# Altium PCB Acoustics Board.PcbDoc (part 2 of 2)
Units mil, origin at the board's own origin, x right, y up, seen from the top; angles counter-clockwise.
Board outline 4000 x 4000 mil, 4 copper layers (Top Layer, Middle 1 Layer, Middle 2 Layer, Bottom Layer), stack 53.912 mil thick; 112 components, 90 nets, 392 pads, 175 vias.
Unrouted connection lines stored in the file: 41.
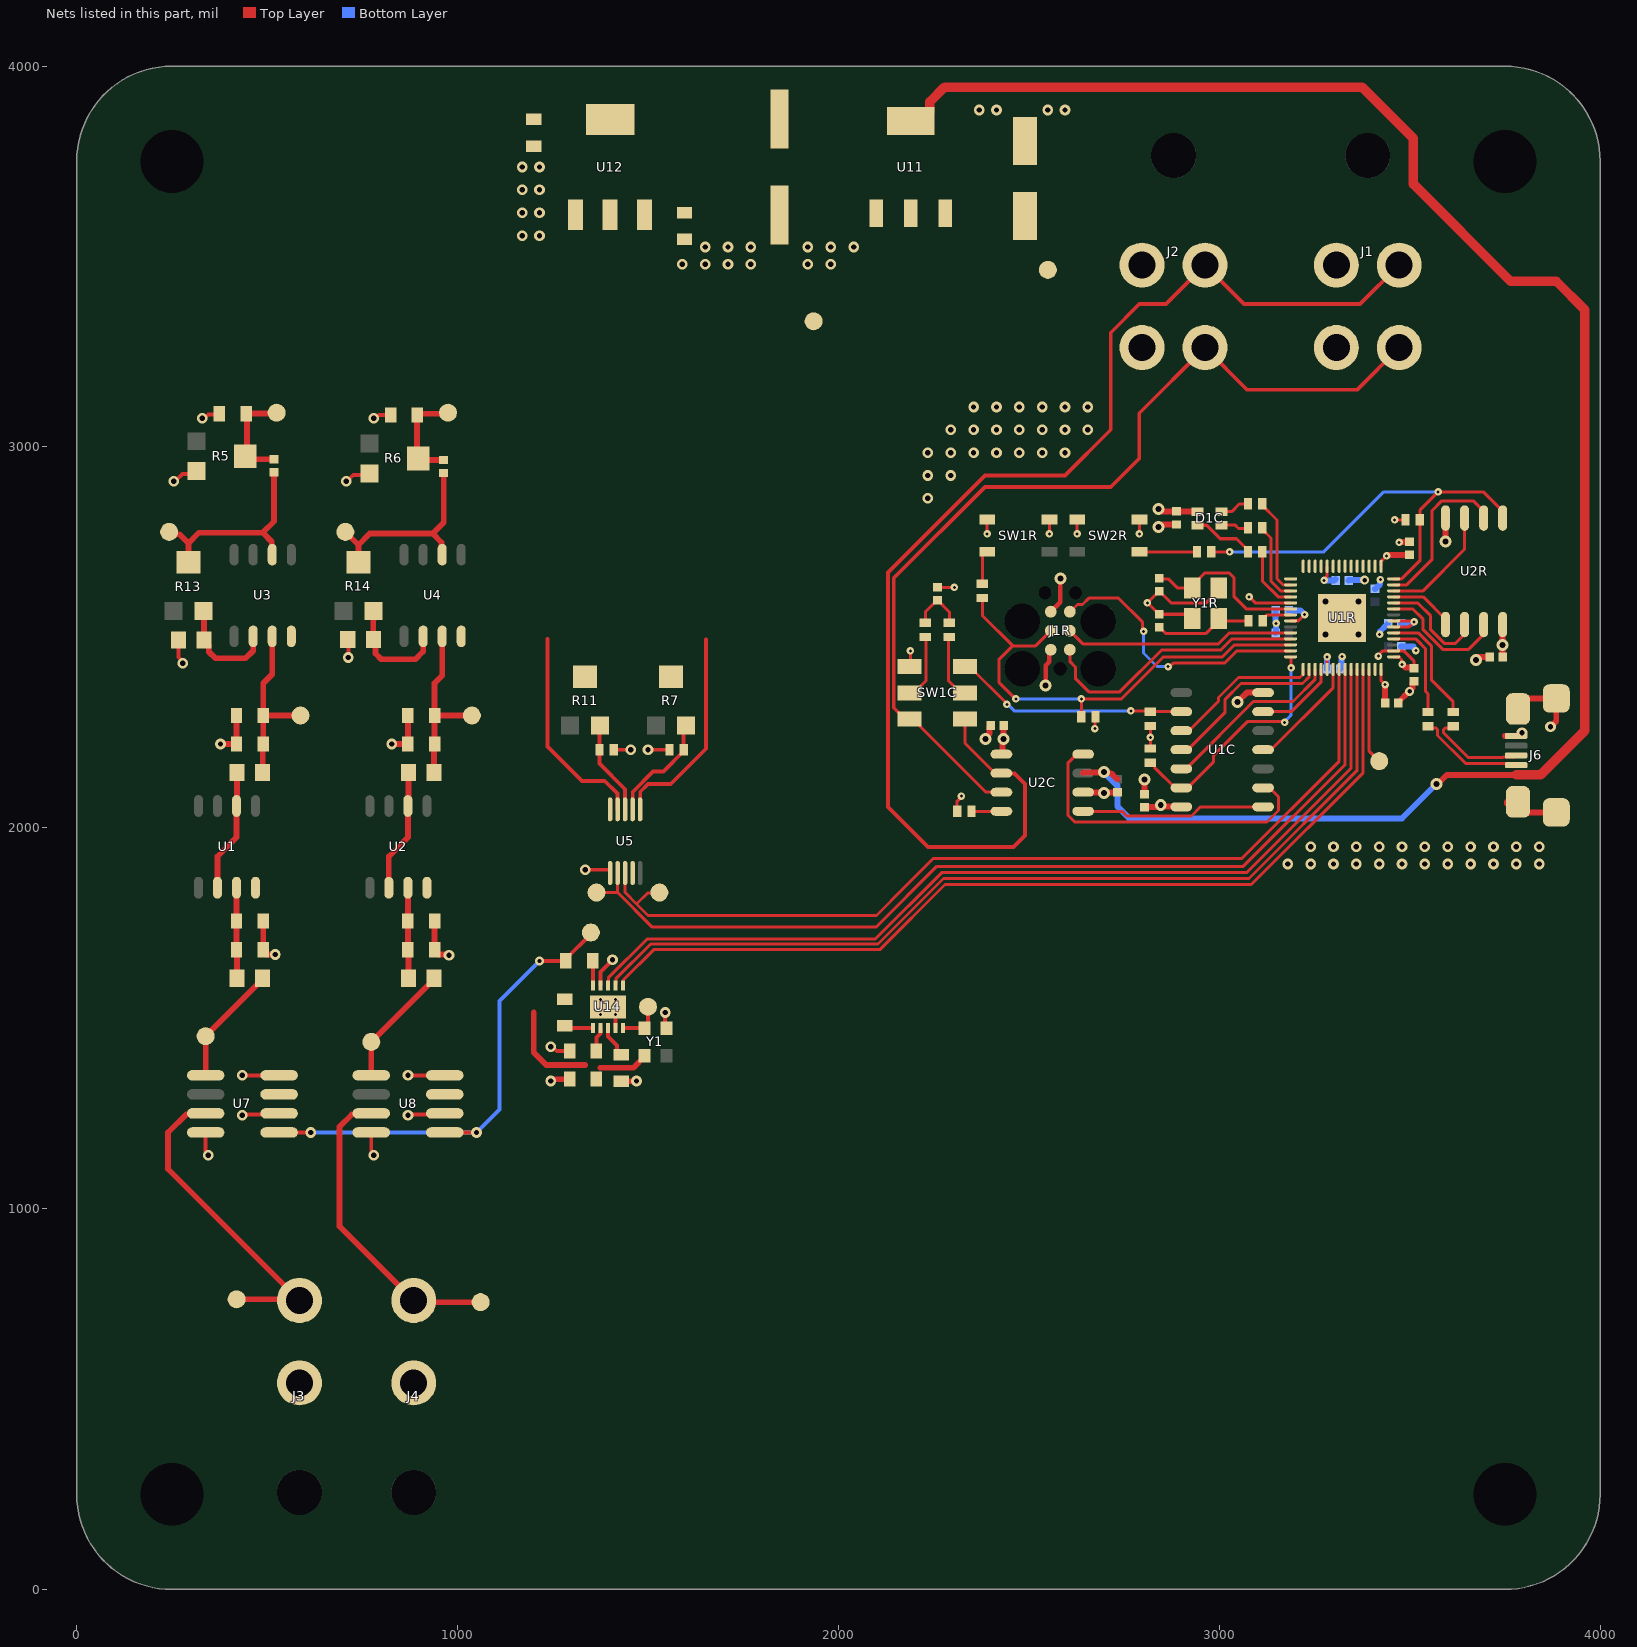
[diagram p4: the nets of this part, all layers, seen from the top]

## Via types
v1: diameter 28, hole 14, Top Layer to Bottom Layer, tented both sides, 99 vias
v2: diameter 19.68, hole 7.87, Top Layer to Bottom Layer, tented both sides, 43 vias
v3: diameter 31.5, hole 15.75, Top Layer to Bottom Layer, tented both sides, 19 vias
v4: diameter 28, hole 14, Top Layer to Bottom Layer, tented top, 11 vias
v5: diameter 23.62, hole 11.81, Top Layer to Bottom Layer, tented both sides, 2 vias
v6: diameter 24, hole 10, Top Layer to Bottom Layer, tented both sides, 1 vias

## Nets (pads, with @x,y where several pads share a name; then routed paths per layer and width w, separated by ;. In a path a pad name is that pad's centre, name@x,y a point inside that pad or via, vN(x,y) a via of type N, cw(c..) or ccw(c..) an arc to the next point about the centre after c; other vN are vias at no path point) (continued)
3V3: C1C.1 C3C.1 C3R.1 C4R.1 C5C.1 C5R.1 C6R.1 C7R.1 C8R.1 C9R.1 C10R.1 C29.2 C31.1 C32.1 C37.1 D1C.4 J1R.2 R1C.1 R4C.1 R4R.1 R5R.1 R7.2 R11.2 TP19.TP U1C.14 U1R.1 U1R.10 U1R.22 U1R.33 U1R.42 U1R.43 U1R.44 U1R.48 U1R.49 U2C.5 U2R.8 U5.9 U12.2 U12.4 U14.2 Y1.4 | length 1798.9
  Top Layer w7.87: v2(2673.23,2260.12) 2674.21,2261.1 2674.21,2290.63 R4R.1@2675.2,2291.61 ; C1C.1@2803.15,2054.02 C1C.1@2803.64,2054.51 ; R4C.1@2818.9,2207.95 v2(2818.9,2237.78) R1C.1@2818.9,2267.6 ; v2(3275.59,2649.88) 3275.59,2653.08 3283.46,2660.95 U1R.10@3283.46,2686.79 ; U1R.33@3283.46,2416.12 v2(3283.46,2449.09) ; v2(3418.05,2451.06) 3418.05,2453.76 3429.13,2464.84 U1R.44@3458.17,2464.84 3484.25,2464.84 3511.81,2437.28 C4R.1@3511.81,2418.98 ; U1R.42@3425.2,2416.12 3425.2,2386.1 v2(3435.63,2375.67) ; U1R.1@3425.2,2686.79 3425.2,2700.08 v2(3439.23,2714.12) ; U1R.43@3458.17,2449.09 3471.46,2449.09 3478.81,2441.74 v2@3478.81,2430.92 ; U1R.48@3458.17,2527.83 3498.76,2527.83 v2(3511.51,2540.59) 3511.81,2540.89 3508.02,2540.89 3505.32,2543.58 U1R.49@3458.17,2543.58 ; v2(3460.63,2808.6) R5R.1@3489.17,2808.6
  Top Layer w8: U1R.22@3187.5,2543.58 3187.56,2543.65 3207.97,2543.65 v2(3224.41,2560.09)
  Top Layer w9.84: D1C.4@2942.94,2831.01 D1C.4@2943.23,2831.3
  Top Layer w10: C31.1@1364.68,1414.29 1364.68,1449.48 1375.31,1460.11 U14.2@1375.31,1474.29
  Top Layer w11.81: v3(2543.31,2374.29) 2545.08,2376.07 2545.08,2427.25 2554.01,2436.17 2554.01,2463.93 J1R.2@2557.68,2467.6
  Top Layer w15: 1200,1515 1200,1410 1232.7,1377.3 1335,1377.3 ; 1374.49,1370.09 1461.95,1370.09 1491.25,1399.39 Y1.4@1491.25,1401.36
  Top Layer w15.75: U2C.5@2428.15,2193.39 2430.61,2195.85 2430.61,2230.1 v3(2433.07,2232.56) 2433.76,2233.25 2433.76,2267.3 C3C.1@2434.45,2267.99 ; C1C.1@2803.64,2054.51 2837.37,2054.51 2842.2,2059.33 v3(2846.46,2059.33) 2849.28,2056.51 2898.1,2056.51 U1C.14@2900.1,2054.51 ; v3(2840.87,2837.21) 2845.13,2837.21 2851.63,2830.71 C5C.1@2888.11,2830.71 ; C5C.1@2890.52,2831.01 D1C.4@2942.94,2831.01 ; C10R.1@3435.63,2328.29 v2(3435.63,2375.67) ; v2(3439.23,2714.12) 3440.3,2714.12 3442.86,2716.67 C7R.1@3500,2716.67 ; v2(3480.31,2429.41) 3488.91,2420.82 3509.97,2420.82 C4R.1@3511.81,2418.98 ; C3R.1@3744.29,2449.09 U2R.8@3744.29,2533.8
  Bottom Layer w15.75: C8R.1@3182.48,2571.25 3213.37,2571.25 3224.41,2560.2 v2(3224.41,2560.09) ; v2(3275.59,2649.88) 3302.56,2649.88 3305.71,2653.03 C6R.1@3305.71,2653.82 ; C9R.1@3283.46,2417.6 v2(3283.46,2449.09) ; C5R.1@3477.76,2536.95 3506.81,2536.95 3510.45,2540.59 v2(3511.51,2540.59)
  other v1: 2235,2865 2235,2925 2295,2925 2235,2985 2295,2985 2355,2985 2415,2985 2475,2985 2535,2985 2595,2985 2295,3045 2355,3045 2415,3045 2475,3045 2535,3045 2595,3045 2655,3045 2355,3105 2415,3105 2475,3105 2535,3105 2595,3105 2655,3105
  other v3: 3744.09,2480.59
12V: C35.1 J1.3 J2.3 TP16.TP U11.3
+5V: C4C.1 J6.1 U1.7 U2.7 U2C.3 U3.7 U4.7 U5.10 U7.6 U8.6
  other v1: 2355,3405 2400,3405 2445,3405 2490,3405 2355,3450 2400,3450 2445,3450 2490,3450 2355,3495 2400,3495 2445,3495 2490,3495
+5V: C34.1 C36.1 TP18.TP U11.2 U12.3 | length 4757.8
  Top Layer w15.75: 2642.72,2143.39 2644,2144.67 2695.57,2144.67 v3(2696.85,2145.94) ; 2716.2,2142.93 2728.35,2130.79 2729.13,2130.79 2732.28,2127.64 ; v3(3570,2115) 3574.26,2115 3598.08,2138.82 3779.69,2138.82
  Top Layer w25: U11.2@2190,3856.06 2216.57,3856.06 2240.49,3879.98 2240.49,3906.56 2278.94,3945 3375,3945 3510,3810 3510,3690 3765,3435 3885,3435 3960,3360 3960,2255.26 3843.56,2138.82 3779.69,2138.82
  Bottom Layer w15.75: v3(2696.85,2145.94) 2732.28,2110.51 2732.28,2056.16 2763.45,2025 3480,2025 v3(3570,2115)
-5V: U1.4 U2.4 U3.4 U4.4 U5.5 U7.3 U8.3
CANCLK_RP2CAN: U1C.6 U1R.32 | length 217.8
  Top Layer w7.87: U1C.6@3115.16,2305 3189.45,2305 3267.72,2383.27 U1R.32@3267.72,2416.12
CANH_RP2CAN: J1.4 J2.4 SW1C.4 U2C.7 | length 2472.8
  Top Layer w7.87: SW1C.4@2187.01,2285.71 2198.82,2285.71 2214.57,2269.96 2214.57,2266.61 2387.8,2093.39 U2C.7@2428.15,2093.39 U2C.7@2444.88,2093.39
  Top Layer w10: SW1C.4@2187.01,2285.71 2175.2,2285.71 2145.51,2315.39 2145.51,2655.51 2385,2895 2715,2895 2790,2970 2790,3088.39 J2.4@2962.68,3261.06 3073.74,3150 3361.61,3150 J1.4@3472.68,3261.06
CANL_RP2CAN: J1.2 J2.2 SW1C.1 U2C.6 | length 3354.6
  Top Layer w7.87: SW1C.1@2320.87,2285.71 SW1C.1@2332.68,2285.71
  Top Layer w8: SW1C.1@2332.68,2285.71 2332.68,2222.13 2411.42,2143.39 U2C.6@2428.15,2143.39
  Top Layer w10: U2C.6@2428.15,2143.39 2428.74,2142.79 2462.21,2142.79 2490,2115 2490,1980 2460,1950 2235,1950 2130,2055 2130,2670 2385,2925 2595,2925 2715,3045 2715,3300 2790,3375 2860.08,3375 J2.2@2962.68,3477.6 3065.28,3375 3370.08,3375 J1.2@3472.68,3477.6
CANRX_RP2CAN: U1C.2 U2C.4 | length 845.6
  Top Layer w7.87: U2C.4@2642.72,2193.39 2625.98,2193.39 2602.36,2169.76 2602.36,2033.6 2620.53,2015.43 3125.73,2015.43 3155.51,2045.22 3155.51,2081.38 3131.89,2105 U1C.2@3115.16,2105
CANTX_RP2CAN: U1C.1 U2C.1 | length 487.4
  Top Layer w7.87: U2C.1@2642.72,2043.39 2745.06,2043.39 2757.26,2031.18 2926.91,2031.18 2950.73,2055 U1C.1@3115.16,2055
"Comparator L": C5.1 D1.2 R5.2 TP2.TP U5.1 | length 820.6
  Top Layer w10: U5.1@1479.37,2048.66 1479.72,2049.01 1479.72,2094.72 1500,2115 1560,2115 1652.45,2207.45 1652.45,2494.38
  Top Layer w15: D1.2@518,2968.04 476.65,2968.04 476.61,2968 447.09,2968 447.09,3065.16 447.55,3065.62 447.55,3085.62 449.74,3087.81 522.81,3087.81 TP2.TP@525,3090
"Comparator R": C6.1 D2.2 R6.2 TP3.TP U5.4 | length 831
  Top Layer w10: 1236.39,2496.02 1236.39,2213.61 1326.7,2123.3 1386.7,2123.3 1419.97,2090.03 1419.97,2049.01 U5.4@1420.32,2048.66
  Top Layer w15: C6.1@893.4,3083.76 893.4,2965.72 922.92,2965.72 922.97,2965.77 D2.2@963.76,2965.77 ; C6.1@893.61,3083.98 896.62,3086.99 971.99,3086.99 TP3.TP@975,3090
DBG_TX_RP2040: J1R.5 U1R.27 | length 732.1
  Top Layer w7.87: J1R.5@2607.68,2567.6 2609.17,2567.6 2627.74,2586.16 2640.77,2586.16 2657.64,2603.04 2735.82,2603.04 2798.03,2540.82 2798.03,2518.8 v2(2801.18,2515.65) ; v2(2866.14,2423.5) 2870.75,2423.5 2880.6,2433.35 3015.01,2433.35 3046.51,2464.84 U1R.27@3187.5,2464.84
  Bottom Layer w7.87: v2(2801.18,2515.65) 2801.18,2458.94 2836.61,2423.5 v2(2866.14,2423.5)
"Envelope Detector L": D1.1 R13.2 TP7.TP U3.6 | length 558.7
  Top Layer w15: TP7.TP@242.77,2777 248.94,2770.83 269.55,2770.83 293.38,2747 ; R13.2@293.38,2697.09 293.38,2747 ; U3.6@513.38,2717.28 512.11,2718.55 512.11,2751.27 488.38,2775 ; D1.1@518,2933.79 518,2804.63 488.38,2775 ; 293.38,2747 321.38,2775 488.38,2775
"Envelope Detector R": D2.1 R14.2 TP8.TP U4.6 | length 537.5
  Top Layer w15: TP8.TP@705.4,2777 739.68,2742.72 ; R14.2@739.68,2697.72 739.68,2742.72 ; U4.6@959.68,2717.28 958.04,2718.93 958.04,2749.37 934.68,2772.72 ; D2.1@963.76,2931.52 963.76,2801.8 934.68,2772.72 ; 739.68,2742.72 769.68,2772.72 934.68,2772.72
FSYNC: U1R.37 U14.8 | length 2458.5
  Top Layer w7.87: U14.8@1395,1585.71 1395.98,1586.69 1395.98,1605.98 1497.44,1707.44 2096.29,1707.44 2271.18,1882.33 3071.72,1882.33 3346.46,2157.06 U1R.37@3346.46,2416.12
GND: C1.2 C1C.2 C1R.2 C2.2 C2C.1 C2R.2 C3.2 C3C.2 C3R.2 C4.2 C4C.2 C4R.2 C5.2 C5C.2 C5R.2 C6.2 C6R.2 C7R.2 C8R.2 C9R.2 C10R.2 C11R.2 C12R.2 C13R.2 C29.1 C30.1 C31.2 C34.2 C35.2 C36.2 C37.2 J1.1 J1R.6 J2.1 J3.1 J4.1 J6.5 J6.6 J6.7 J6.8 J6.9 L1.2 L2.2 L3.2 L4.2 R5.3 R6.3 R6C.2 R8.2 R9.2 R10.2 R12.2 SW1C.6 SW1R.B1 SW1R.B2 SW2R.B1 SW2R.B2 U1C.7 U1R.19 U1R.57 U2C.2 U2R.4 U5.6 U7.2 U7.4 U7.8 U8.2 U8.4 U8.8 U11.1 U12.1 U14.4 U14.9 U14.11 Y1.2 Y1R.2 Y1R.4 | length 3751
  Top Layer w7.87: SW1C.6@2187.01,2423.5 2188.98,2425.47 v2(2188.98,2464.84) ; C2C.1@2259.84,2631.57 v2(2304.44,2631.57) ; R6C.2@2312.01,2043.39 2312.01,2069.96 2322.83,2080.79 v2(2322.83,2082.95) ; v2(2390.75,2771.93) SW1R.B2@2390.75,2809.33 ; v2(2554.13,2771.93) 2554.13,2805.47 SW1R.B1@2554.25,2805.59 ; v2(2626.97,2771.93) SW2R.B2@2626.97,2809.33 ; v2(2790.35,2771.93) SW2R.B1@2790.35,2809.33 ; v2(3078.74,2606.57) 3094.49,2590.83 U1R.19@3187.5,2590.83 ; U1R.57@3275.59,2590.83 v3(3279.53,2594.76)
  Top Layer w8: SW1R.B1@2551.57,2808.27 SW1R.B1@2554.25,2805.59 ; v2(2811.02,2590.83) v2@2811.61,2590.83 ; Y1R.2@2929.13,2550.2 2918.62,2560.71 C2R.2@2842.52,2560.71 2841.73,2560.71 v2@2811.61,2590.83 ; Y1R.4@2999.13,2630.2 2999.13,2624.29 2965.61,2590.76 2873.49,2590.76 2843.31,2620.94 C1R.2@2842.52,2620.94 2841.73,2620.94 v2@2811.61,2590.83
  Top Layer w10: v1(255,2910) 258.75,2910 277.38,2928.63 307.37,2928.63 R5.3@315,2936.26 ; R9.2@267.35,2493.51 267.35,2447.9 278.38,2436.87 v1(278.38,2432) ; v1(330,3075) 334.87,3075 345.49,3085.62 C5.2@374.77,3085.62 ; U7.8@338.54,1200 338.54,1151.33 345,1144.87 v4(345,1140) ; v4(435,1350) U7.4@531.46,1350 ; v4@437.5,1247.5 U7.2@528.96,1247.5 ; v1@705,2910 709.87,2910 726.22,2926.35 R6.3@765.44,2926.35 ; R10.2@712.02,2494.37 713.38,2493.02 v1(713.38,2447) ; U8.8@773.54,1200 773.54,1151.33 780,1144.87 v4(780,1140) ; v1(780,3075) 784.87,3075 793.86,3083.98 C6.2@823.61,3083.98 ; v4(870,1245) 872.5,1247.5 963.96,1247.5 U8.2@966.46,1250 ; v4(870,1350) U8.4@966.46,1350 ; v1(1245,1425) 1249.87,1425 1260.58,1414.29 C31.2@1294.68,1414.29 ; v4(1335,1890) 1399.79,1890 1400.63,1889.16 U5.6@1400.63,1881.34 ; U14.9@1375.31,1585.71 1375.31,1621.82 v1(1406.75,1653.25) ; R12.2@1410,2205 v4(1455,2205) ; U14.4@1414.68,1474.29 v2(1414.68,1510.31) ; v4(1500,2205) R8.2@1556.3,2205 ; v1(1545,1515) 1545,1477.53 Y1.2@1548.34,1474.2 ; J6.7@3780,2310 3782.56,2310 J6.7@3784.61,2312.05
  Top Layer w11.81: J1R.6@2557.68,2567.6 2582.59,2592.51 v3(2582.59,2654.14)
  Top Layer w15: v1(377.68,2220) L3.2@419.68,2220 C3.2@419.68,2295 ; C1.2@489.68,1755 L1.2@489.68,1680 489.68,1675 497.18,1667.5 v1(521.67,1667.5) ; v1(827.68,2220) L4.2@869.68,2220 C4.2@869.68,2295 ; L2.2@939.68,1755 C2.2@939.68,1680 939.68,1675 947.18,1667.5 971.67,1667.5 974.17,1665 v1(977.68,1665) ; v1(1245,1335) 1248.52,1335 1253.61,1340.09 C29.1@1294.49,1340.09 ; C30.1@1429.68,1334.29 1430.04,1334.65 1469.65,1334.65 v1(1470,1335) ; 3749.69,2241.18 3750.06,2241.56 3783.04,2241.56 3791.48,2250 v1(3795,2250) ; J6.6@3754.61,2067.95 3754.61,2063.76 3777.97,2040.39 J6.9@3855,2040.39 ; J6.7@3807.97,2339.61 J6.8@3885,2339.61 3885,2280 v1(3870,2265)
  Top Layer w15.75: v3(2385.83,2232.56) 2385.83,2236.82 2397.05,2248.04 2397.05,2264.06 2400.2,2267.2 C3C.2@2400.2,2267.99 ; U2C.2@2642.72,2093.39 2644,2092.11 2695.57,2092.11 v3(2696.85,2090.83) 2698.13,2092.11 2731,2092.11 C4C.2@2732.28,2093.39 ; C1C.2@2803.15,2088.27 v3(2803.15,2126.26) ; v3(2840.87,2789.96) 2845.13,2789.96 2851.63,2796.46 C5C.2@2888.11,2796.46 ; v3(3047.77,2330.46) 3072.32,2355 U1C.7@3115.16,2355 ; C10R.2@3469.28,2328.89 3498.93,2358.54 v5(3500,2358.54) 3500,2359.61 3507.87,2367.48 3507.87,2381.57 3511.02,2384.72 C4R.2@3511.81,2384.72 ; v2(3472.44,2749.55) 3473.13,2750.24 3499.31,2750.24 C7R.2@3500,2750.93 ; U2R.4@3594.29,2813.32 3594.39,2813.23 3594.39,2752.34 v3(3594.49,2752.24) ; v3(3674.41,2441.22) 3682.28,2449.09 C3R.2@3707.28,2449.09
  Bottom Layer w15.75: C12R.2@3148.23,2512.09 3148.92,2512.78 3148.92,2536.26 v2(3149.61,2536.95) 3149.61,2538.02 3148.23,2539.39 C8R.2@3148.23,2571.25 ; C9R.2@3317.72,2417.6 3320.87,2420.75 3320.87,2446.55 3322.83,2448.52 v2(3322.83,2449.58) ; C6R.2@3339.96,2649.88 3340.14,2650.06 3381.9,2650.06 v5(3382.08,2650.25) ; C13R.2@3409.45,2627.64 3410.24,2627.64 3422.56,2639.96 3422.56,2651.18 v2(3423.31,2651.93) ; v2(3421.26,2508.15) 3422.01,2508.9 3422.01,2515.46 3439.57,2533.01 3440.35,2533.01 3443.5,2536.16 C5R.2@3443.5,2536.95 ; C11R.2@3477.76,2476.65 3510.75,2476.65 3510.75,2471.78 3516.18,2466.34 v2(3516.18,2465.28)
  other v1: 3180,1905 3240,1905 3300,1905 3360,1905 3420,1905 3480,1905 3540,1905 3600,1905 3660,1905 3720,1905 3780,1905 3840,1905 3240,1950 3300,1950 3360,1950 3420,1950 3480,1950 3540,1950 3600,1950 3660,1950 3720,1950 3780,1950 3840,1950 707.44,2910 1590,3480 1650,3480 1710,3480 1770,3480 1920,3480 1980,3480 1650,3525 1710,3525 1770,3525 1920,3525 1980,3525 2040,3525 1170,3555 1215,3555 1170,3615 1215,3615 1170,3675 1215,3675 1170,3735 1215,3735 2370,3885 2415,3885 2550,3885 2595,3885
  other v2: 1375.31,1510.31 1375.31,1549.68 1414.68,1549.68
  other v3: 3279.53,2508.15 3366.14,2508.15 3366.14,2594.76
  other v4: 435,1245
"Hydrophone L": J3.2 TP15.TP U7.7 | length 869.5
  Top Layer w15: U7.7@338.54,1250 336.14,1247.6 287.6,1247.6 240,1200 240,1103.94 J3.2@585,758.94 581.97,761.97 TP15.TP@420,761.97
"Hydrophone R": J4.2 TP17.TP U8.7 | length 818.6
  Top Layer w15: U8.7@773.54,1250 771.14,1247.6 722.6,1247.6 690,1215 690,953.94 J4.2@885,758.94 889.47,754.47 TP17.TP@1060.53,754.47 TP17.TP@1065,750
INT_RP2CAN: U1C.4 U1R.34 | length 297.2
  Top Layer w7.87: U1C.4@3115.16,2205 3136.15,2205 3299.21,2368.06 U1R.34@3299.21,2413.66
LEDB_RP2CAN: R8C.1 U1R.18 | length 168.1
  Top Layer w7.87: R8C.1@3113.19,2724.68 3113.19,2648.03 3154.64,2606.57 U1R.18@3187.5,2606.57
LEDG_RP2CAN: R7C.1 U1R.17 | length 211.6
  Top Layer w7.87: R7C.1@3113.19,2787.68 3113.19,2783.74 3135.83,2761.1 3135.83,2647.66 3161.17,2622.32 U1R.17@3187.5,2622.32
LEDR_RP2CAN: R5C.1 U1R.16 | length 255
  Top Layer w7.87: R5C.1@3113.19,2850.67 3113.19,2846.73 3151.57,2808.35 3151.57,2654.19 3167.69,2638.07 U1R.16@3187.5,2638.07
"Local Oscillator": C33.2 TP13.TP U7.1 U8.1 | length 1291.5
  Top Layer w10: U7.1@531.46,1200 v4(615,1200) ; U8.1@966.46,1200 v4(1050,1200) ; v6(1215,1650) 1283.47,1650 C33.2@1284.67,1651.2 1284.67,1656.2 1350,1721.53 TP13.TP@1350,1725
  Bottom Layer w10: v4(615,1200) v4(1050,1200) 1110,1260 1110,1545 v6(1215,1650)
MCLK: TP14.TP U14.5 Y1.3 | length 116.3
  Top Layer w10: U14.5@1434.37,1474.29 1475.41,1474.29 1475.5,1474.2 Y1.3@1491.25,1474.2 1500,1482.94 TP14.TP@1500,1530
MISO_RP2CAN: U1C.12 U1R.31 | length 475
  Top Layer w7.87: U1C.12@2900.59,2155 2913.06,2155 3089.44,2331.38 3193.56,2331.38 3251.97,2389.79 U1R.31@3251.97,2416.12
MOSI_RP2CAN: U1C.11 U1R.30 | length 454.6
  Top Layer w7.87: U1C.11@2900.59,2205 2917.32,2205 3015.75,2303.43 3015.75,2337.4 3056.97,2378.62 3218.53,2378.62 3236.22,2396.31 U1R.30@3236.22,2416.12
nCS_RP2CAN: R4C.2 U1C.13 U1R.28 | length 646.2
  Top Layer w7.87: R4C.2@2818.9,2170.55 2822.83,2170.55 2829.72,2163.66 2829.72,2159.13 2883.86,2105 U1C.13@2900.59,2105 2917.32,2105 2984.51,2172.19 2984.51,2189.51 3073.62,2278.62 3170.47,2278.62 v2(3172.03,2277.07) ; U1R.28@3187.5,2449.09 3188.98,2449.09 v2(3188.98,2419.96)
  Bottom Layer w7.87: v2(3172.03,2277.07) 3172.03,2279.36 3188.98,2296.31 v2(3188.98,2419.96)
NetC1_1: C1.1 L1.1 R1.1 U1.3 | length 238.3
  Top Layer w15: U1.3@419.68,1842.72 C1.1@419.68,1755 L1.1@419.68,1680 421.18,1678.5 R1.1@421.18,1605
NetC2_1: C2.1 L2.1 R2.1 U2.3 | length 238.3
  Top Layer w15: U2.3@869.68,1842.72 L2.1@869.68,1755 C2.1@869.68,1680 871.18,1678.5 R2.1@871.18,1605
NetC2C_2: C2C.2 R2C.2 R3C.2 | length 144.3
  Top Layer w7.87: R3C.2@2228.35,2538.66 2228.35,2566.61 2259.06,2597.32 C2C.2@2259.84,2597.32 2260.63,2597.32 2291.34,2566.61 R2C.2@2291.34,2538.66
NetC2R_1: C2R.1 R1R.2 Y1R.3 | length 263.4
  Top Layer w8: C2R.1@2842.52,2526.46 2843.31,2526.46 2859,2510.76 2965.61,2510.76 2999.13,2544.29 Y1R.3@2999.13,2550.2 3005.75,2543.58 R1R.2@3076.85,2543.58
NetC30_2: C30.2 U14.3 | length 85
  Top Layer w10: U14.3@1395,1474.29 1395,1452.02 1418.59,1428.43 1418.59,1414.29 1428.59,1404.29 C30.2@1429.68,1404.29
NetC32_2: C32.2 U14.1 | length 76.6
  Top Layer w10: C32.2@1281.42,1480.12 1287.26,1474.29 U14.1@1355.63,1474.29
NetC33_1: C33.1 U14.10 | length 65.9
  Top Layer w10: C33.1@1354.67,1651.2 1355.63,1650.24 U14.10@1355.63,1585.71
NetD1C_1: D1C.1 R5C.2 | length 78.2
  Top Layer w7.87: D1C.1@3006.22,2829.93 3032.78,2829.93 3053.52,2850.67 R5C.2@3075.79,2850.67
NetD1C_2: D1C.2 R7C.2 | length 73.7
  Top Layer w7.87: D1C.2@3006.22,2794.49 3042.32,2794.49 3050.75,2786.07 3074.18,2786.07 R7C.2@3075.79,2787.68
NetD1C_3: D1C.3 R8C.2 | length 163.8
  Top Layer w8: D1C.3@2943.23,2794.49 2966.92,2794.49 3002.41,2759 3045.41,2759 3075.79,2728.62 R8C.2@3075.79,2724.68
NetR2C_1: R2C.1 SW1C.2 | length 172.3
  Top Layer w7.87: R2C.1@2291.34,2501.26 2289.37,2499.29 2289.37,2386.1 2320.87,2354.61 SW1C.2@2332.68,2354.61
NetR3_2: R3.2 U1.2 U1.6 | length 323.6
  Top Layer w15: U1.2@369.68,1842.72 369.68,1925 419.68,1975 U1.6@419.68,2057.28 421.18,2058.78 R3.2@421.18,2145
NetR3C_1: R3C.1 SW1C.5 | length 172.3
  Top Layer w7.87: SW1C.5@2187.01,2354.61 2198.82,2354.61 2230.32,2386.1 2230.32,2499.29 R3C.1@2228.35,2501.26
NetR4_2: R4.2 U2.2 U2.6 | length 323.6
  Top Layer w15: U2.2@819.68,1842.72 819.68,1925 869.68,1975 U2.6@869.68,2057.28 871.18,2058.78 R4.2@871.18,2145
NetR6C_1: R6C.1 U2C.8 | length 78.7
  Top Layer w7.87: R6C.1@2349.41,2043.39 U2C.8@2428.15,2043.39
NetR6R_1: R6R.1 SW1R.A2 | length 91.3
  Top Layer w7.87: R6R.1@2377.95,2641.02 2377.95,2715.83 2386.81,2724.68 SW1R.A2@2390.75,2724.68
NetR7_3: R7.3 R8.1 U5.2 | length 294
  Top Layer w10: U5.2@1459.69,2048.66 1460.03,2049.01 1460.03,2094.18 1513.63,2147.78 1540.42,2147.78 1593.7,2201.06 R8.1@1593.7,2205 1593.7,2263.46 R7.3@1599.37,2269.13
NetR7R_1: R7R.1 SW2R.A1 | length 151.6
  Top Layer w7.87: SW2R.A1@2790.35,2724.68 R7R.1@2941.93,2724.68
NetR9_1: R9.1 R13.3 U3.2 | length 282.2
  Top Layer w15: R13.3@332.75,2569.13 334.35,2567.53 R9.1@334.35,2493.51 346.85,2481.01 346.85,2462.51 364.36,2445 443.38,2445 463.38,2465 U3.2@463.38,2502.72
NetR10_1: R10.1 R14.3 U4.2 | length 293.9
  Top Layer w15: 779.02,2546.11 R10.1@779.02,2494.37 784.68,2488.71 784.68,2457.72 799.68,2442.72 889.68,2442.72 909.68,2462.72 U4.2@909.68,2502.72 ; R14.3@779.06,2546.14 R14.3@779.06,2569.76
NetR11_3: R11.3 R12.1 U5.3 | length 249.1
  Top Layer w10: R11.3@1374.37,2269.13 1372.6,2267.36 R12.1@1372.6,2205 1372.6,2168.69 1440,2101.29 U5.3@1440,2048.66
NetTP_ADC_TP: TP_ADC.TP U1R.40 | length 252
  Top Layer w7.87: U1R.40@3393.7,2416.12 3393.7,2201.3 TP_ADC.TP@3420,2175
NetU1R_2: U1R.2
NetU1R_3: U1R.3
NetU1R_4: U1R.4
NetU1R_5: U1R.5
NetU1R_6: U1R.6
NetU1R_7: U1R.7
NetU1R_8: U1R.8
NetU1R_9: U1R.9
NetU1R_11: U1R.11
NetU1R_12: U1R.12
NetU1R_13: U1R.13
NetU1R_14: U1R.14
NetU1R_15: U1R.15
NetU1R_41: U1R.41
"Point Filter L": R1.2 TP5.TP U7.5 | length 317
  Top Layer w15: U7.5@338.54,1350 TP5.TP@338.54,1452.86 488.18,1602.5 R1.2@488.18,1605
"Point Filter R": R2.2 TP6.TP U8.5 | length 323.2
  Top Layer w15: U8.5@773.54,1350 TP6.TP@773.54,1437.86 938.18,1602.5 R2.2@938.18,1605
"Post Filter Amp L": C3.1 L3.1 R3.1 TP1.TP U3.3 | length 466.2
  Top Layer w15: R3.1@488.18,2145 488.18,2218.5 L3.1@489.68,2220 C3.1@489.68,2295 ; U3.3@513.38,2502.72 513.38,2403.38 489.68,2379.68 C3.1@489.68,2295 ; TP1.TP@587.68,2295 C3.1@489.68,2295
"Post Filter Amp R": C4.1 L4.1 R4.1 TP4.TP U4.3 | length 464.6
  Top Layer w15: R4.1@938.18,2145 938.18,2218.5 L4.1@939.68,2220 C4.1@939.68,2295 ; U4.3@959.68,2502.72 959.68,2399.68 939.68,2379.68 C4.1@939.68,2295 ; TP4.TP@1037.68,2295 C4.1@939.68,2295
QSPI_SCLK_RP2040: U1R.52 U2R.6 | length 283
  Top Layer w7.87: U1R.52@3458.17,2590.83 3520.87,2590.83 3555.12,2556.57 3555.12,2520.04 3590.63,2484.53 3620.67,2484.53 3644.29,2508.15 U2R.6@3644.29,2529.8
QSPI_SD0_RP2040: U1R.53 U2R.5 | length 178.4
  Top Layer w7.87: U1R.53@3458.17,2606.57 3535.43,2606.57 3594.29,2547.72 U2R.5@3594.29,2533.8 U2R.5@3594.29,2529.8
QSPI_SD1_RP2040: U1R.55 U2R.2 | length 435.6
  Top Layer w7.87: U1R.55@3458.17,2638.07 3492.13,2638.07 3559.06,2705 3559.06,2833.15 3584.51,2858.6 3654.08,2858.6 3654.13,2858.54 3666.73,2858.54 3694.29,2830.98 U2R.2@3694.29,2813.32 U2R.2@3694.29,2809.33
QSPI_SD2_RP2040: U1R.54 U2R.3 | length 309.4
  Top Layer w7.87: U1R.54@3458.17,2622.32 3535.43,2622.32 3644.29,2731.18 U2R.3@3644.29,2809.33
QSPI_SD3_RP2040: U1R.51 U2R.7 | length 334.1
  Top Layer w7.87: U1R.51@3458.17,2575.08 3507.65,2575.08 3535.43,2547.29 3535.43,2519.96 3586.61,2468.78 3654.92,2468.78 3694.29,2508.15 U2R.7@3694.29,2529.8
QSPI_SS_RP2040: R5R.2 R7R.2 U1R.56 U2R.1 | length 1162
  Top Layer w7.87: R7R.2@2979.33,2724.68 v2(3027.56,2724.69) ; U1R.56@3458.17,2653.82 3479.07,2653.82 3527.56,2702.3 3527.56,2834.92 v2(3574.8,2882.17) 3693.11,2882.17 3744.29,2830.98 U2R.1@3744.29,2813.32 U2R.1@3744.29,2809.33
  Bottom Layer w7.87: v2(3027.56,2724.69) 3274.55,2724.69 3432.03,2882.17 v2(3574.8,2882.17)
"RP2040 L": TP9.TP U1R.35 U5.8 | length 2432.5
  Top Layer w8: U5.8@1440,1881.34 1440,1830 1470,1800 ; TP9.TP@1530,1830 1529.06,1829.06 1499.06,1829.06 1470,1800 ; U1R.35@3314.96,2416.12 3314.96,2174.96 3060,1920 2250,1920 2175,1845 2100,1770 1500,1770 1470,1800
"RP2040 R": TP10.TP U1R.36 U5.7 | length 2495.8
  Top Layer w8: TP10.TP@1350,1830 1420.32,1830 ; U5.7@1420.32,1881.34 1420.32,1830 ; U1R.36@3330.71,2416.12 3330.71,2166.22 3063.16,1898.67 2258.67,1898.67 2100,1740 1510.32,1740 1420.32,1830
RUN_RP2040: J1R.4 R4R.2 R6R.2 U1R.26 | length 1275.3
  Top Layer w7.87: R6R.2@2377.95,2603.62 2377.95,2557.73 2457.64,2478.04 ; v2(2465.89,2338.86) 2464.57,2338.86 2422.24,2381.19 2422.24,2442.63 2457.64,2478.04 ; J1R.4@2557.68,2517.6 2518.11,2478.04 2457.64,2478.04 ; R4R.2@2637.8,2291.61 v2(2637.8,2338.86) 2743.34,2338.86 2853.57,2449.09 3008.49,2449.09 3039.99,2480.59 U1R.26@3187.5,2480.59
  Bottom Layer w7.87: v2(2465.89,2338.86) v2(2637.8,2338.86)
SCK_RP2CAN: U1C.10 U1R.29 | length 400.1
  Top Layer w7.87: U1C.10@2900.59,2255 2920.84,2255 2998.21,2332.37 2998.21,2342.14 3050.44,2394.37 3212.01,2394.37 3220.47,2402.83 U1R.29@3220.47,2416.12
SCLK: U1R.38 U14.7 | length 2456.6
  Top Layer w7.87: U14.7@1414.68,1585.71 1415.67,1586.69 1415.67,1603.34 1507.33,1695 2104.09,1695 2275.77,1866.68 3078.05,1866.68 3362.2,2150.83 U1R.38@3362.2,2416.12
SDATA: U1R.39 U14.6 | length 2454.4
  Top Layer w7.87: U14.6@1434.37,1585.71 1435.35,1586.69 1435.35,1600.35 1515,1680 2108.71,1680 2279.74,1851.03 3084.08,1851.03 3377.95,2144.9 U1R.39@3377.95,2416.12
SWCLK_RP2040: J1R.3 U1R.24 | length 606.9
  Top Layer w7.87: J1R.3@2607.68,2517.6 2643.11,2482.16 2997.01,2482.16 3026.94,2512.09 U1R.24@3187.5,2512.09
SWDIO_RP2040: J1R.1 U1R.25 | length 718.6
  Top Layer w7.87: J1R.1@2607.68,2467.6 2607.68,2437.06 2622.24,2422.49 2622.24,2392.56 2657.64,2357.16 2738.89,2357.16 2848.14,2466.41 3003.54,2466.41 3033.46,2496.34 U1R.25@3187.5,2496.34
TERM_DET_RP2CAN: R1C.2 SW1C.3 U1C.9 | length 621.6
  Top Layer w7.87: SW1C.3@2332.68,2423.5 2344.49,2423.5 2442.46,2325.53 v2(2442.46,2324.35) ; v2(2767.72,2307.36) 2768.9,2306.18 2821.65,2306.18 R1C.2@2822.83,2305 ; R1C.2@2818.9,2305 R1C.2@2822.83,2305 ; U1C.9@2900.59,2305 R1C.2@2822.83,2305
  Bottom Layer w7.87: v2(2442.46,2324.35) 2444.75,2324.35 2461.74,2307.36 v2(2767.72,2307.36)
USB_N: J6.2 R3R.1 | length 282.6
  Top Layer w7.87: R3R.1@3548.32,2266.38 3552.1,2262.6 3568.77,2262.6 3573.38,2257.99 3573.38,2242.58 3646.7,2169.27 3745.54,2169.27 3746.47,2168.35 3775.75,2168.35 J6.2@3779.69,2164.41
USB_P: J6.3 R2R.1 | length 256.3
  Top Layer w7.87: R2R.1@3614.33,2266.38 3610.54,2262.6 3593.87,2262.6 3589.26,2257.99 3589.26,2249.16 3653.27,2185.14 3745.54,2185.14 3746.47,2186.06 3775.75,2186.06 J6.3@3779.69,2190
USB_RP2040_N: R3R.2 U1R.46 | length 263.6
  Top Layer w7.87: U1R.46@3458.17,2496.34 3515.75,2496.34 3525.15,2486.93 3537.84,2474.25 3541.9,2470.19 3541.9,2398.74
  Top Layer w8: 3541.9,2398.74 3541.9,2358.11 3548.32,2351.69 R3R.2@3548.32,2303.78
USB_RP2040_P: R2R.2 U1R.47 | length 310.5
  Top Layer w7.87: U1R.47@3458.17,2512.09 3522.27,2512.09 3531.68,2502.68 3557.83,2476.52 3557.83,2387.42 3557.9,2387.36
  Top Layer w8: 3557.9,2387.36 3557.9,2387.11 3614.33,2330.68 R2R.2@3614.33,2303.78
XIN_RP2040: C1R.1 U1R.20 Y1R.1 | length 443.1
  Top Layer w7.87: C1R.1@2842.52,2655.2 2843.8,2653.92 2866.14,2653.92 2889.86,2630.2 Y1R.1@2929.13,2630.2 2929.13,2636.1 2962.6,2669.57 3025.68,2669.57 3039.37,2655.88 3039.37,2606.57 3070.87,2575.08 U1R.20@3187.5,2575.08
XOUT_RP2040: R1R.1 U1R.21 | length 82.1
  Top Layer w7.87: R1R.1@3114.25,2543.58 3114.25,2547.52 3126.06,2559.33 U1R.21@3187.5,2559.33
pads on no net: J1. J1R.A J1R.B J1R.C J1R.D J1R.E J1R.F J1R.G J2. J3. J4. J6.4 R5.1 R6.1 R7.1 R11.1 R13.1 R14.1 SW1R.A1 SW2R.A2 U1.1 U1.5 U1.8 U1C.3 U1C.5 U1C.8 U2.1 U2.5 U2.8 U3.1 U3.5 U3.8 U4.1 U4.5 U4.8 Y1.1

## Polygon pours and split planes (outlines as drawn)
no net on Top Layer "NONET_L01_P009" (solid, pour order 9): 1800,3960 2235,3960 2295,3900 2295,3735 2235,3675 2235,3570 2220,3555 2160,3555 2145,3570 2145,3675 2085,3735 1800,3735 1755,3780 1755,3915
no net on Top Layer "NONET_L01_P010" (solid, pour order 10): 1830,3960 1830,3735 1680,3585 1560,3585 1515,3540 1485,3540 1455,3570 1455,3660 1500,3705 1560,3705 1605,3750 1605,3870 1695,3960 1710,3960
no net on Top Layer "NONET_L01_P013" (solid, pour order 13): 2250,3660 2295,3705 2550,3705 2595.28,3659.72 2594.76,3434.76 2535,3375 2310,3375 2250,3435
3V3 on Top Layer "3V3_L01_P062" (solid, pour order 62): 1230,1590 1305,1590 1320,1575 1320,1515 1305,1500 1155,1500 1140,1515 1140,1575 1155,1590
GND on Top Layer "GND_L01_P070" (solid, pour order 70): 3615,2115 3570,2070 3270,2070 3120,1920 3120,1770 3195,1695 3840,1695 3930,1785 3930,2070 3885,2115
GND on Top Layer "GND_L01_P071" (solid, pour order 71): 2370,3915 2340,3885 2340,3765 2385,3720 2610,3720 2655,3765 2655,3870 2610,3915 2580,3915
3V3 on Top Layer "3V3_L01_P069" (solid, pour order 69): 2040,2775 1995,2820 1995,3240 2040,3285 2085,3285 2235,3135 2670,3135 2700,3105 2700,3060 2580,2940 2370,2940 2250,2820 2145,2820 2100,2775
3V3 on Top Layer "3V3_L01_P061" (solid, pour order 61): 1328.36,1448.36 1371.64,1448.36 1395,1425 1395,1320 1380,1305 1335,1305 1320,1320 1320,1440
3V3 on Top Layer "3V3_L01_P060" (solid, pour order 60): 1350,3555 1350,3315 1425,3240 1830,3240 1920,3150 1920,2610 1800,2490 1800,2430 1890,2340 2040,2340 2100,2400 2100,3270 1950,3420 1575,3420 1425,3570 1365,3570
GND on Top Layer "GND_L01_P030" (solid, pour order 30): 1155,3810 1215,3810 1335,3690 1335,3540 1320,3525 1155,3525 1125,3555 1125,3780
3V3 on Top Layer "3V3_L01_P011" (solid, pour order 11): 1200,3930 1155,3885 1155,3840 1170,3825 1215,3825 1350,3690 1350,3555 1365,3540 1425,3540 1440,3555 1440,3690 1515,3765 1515,3885 1470,3930
GND on Top Layer "GND_L01_P012" (solid, pour order 12): 1680,3570 1830,3720 2085,3720 2130,3675 2130,3570 2010,3450 1575,3450 1530,3495 1530,3540 1560,3570
GND on Middle 1 Layer "GND_L02_P006" (solid, pour order 6): -60,4125 4095,4125 4095,-75 -60,-75
GND on Middle 2 Layer "GND_L03_P014" (solid, pour order 14): -60,4125 4095,4125 4095,-75 -60,-75
no net on Bottom Layer "NONET_L04_P015" (solid, pour order 15): 2310,3525 2580,3525 2730,3375 3315,3375 3390,3300 3390,3195 3360,3165 2340,3165 2250,3255 2250,3465
3V3 on Bottom Layer "3V3_L04_P068" (solid, pour order 68): 2310,3135 2190,3015 2190,2880 2250,2820 2670,2820 2730,2880 2730,3075 2670,3135
3V3 on Bottom Layer "3V3_L04_P065" (solid, pour order 65): 2655,3135 2340,2820 2340,2085 2385,2040 3450,2040 3870,2460 3870,2850 3585,3135 3570,3135

## Keep-outs
Keep-Out Layer:
  the board outline again, w10

## Silkscreen, mask and mechanical layers (free items; w line width, h text height)
Top Overlay:
  drawing of 55 lines, arcs and shapes, not listed
  text "5V" at 2180,3905 h30
  text "The Underwater" at 85,3535 h60
  text "Robotics Team" at 100,3430 h60
  text "15V" at 2555,3380 h30
  text "3V3" at 1985,3320 h30
  text "Acoustics Board" at 100,3310 h60
  text "Env. L" at 190,2915 h30 r90
  text "Env. R" at 1135,2915 h30 r90
  text "RESET" at 2565.74,2887.78 h40 r180
  text "BOOT" at 2781.97,2887.78 h40 r180
  text "Envelope L" at 195,2465 h30 r90
  text "Envelope R" at 1125,2465 h30 r90
  text "TERM / ON" at 2338.15,2243.27 h40 r180
  text "Point L" at 190,1835 h30 r90
  text "Point R" at 625,1835 h30 r90
  text "Out R" at 1175,1820 h30
  text "Out L" at 1580,1820 h30
  text "Mix L" at 682.68,1765 h30 r270
  text "Local Oscillator" at 1400,1715 h30
  text "DDS Clock" at 1535,1565 h30
  text "Mult L" at 265,920 h30 r90
  text "Mult R" at 685,920 h30 r90
  text "Hydrophone R" at 65,810 h30
  text "Hydrophone L" at 1055,795 h30